# Altium PCB rp2350_led_control_pcb.PcbDoc (part 4 of 4)
Units mm, origin at the board's own origin, x right, y up, seen from the top; angles counter-clockwise.
Board outline 143.9 x 131.3 mm, 4 copper layers (L1(SIG), L2(GND), L3(PWR), L4(SIG)), stack 1.591 mm thick; 168 components, 192 nets, 814 pads, 1003 vias.
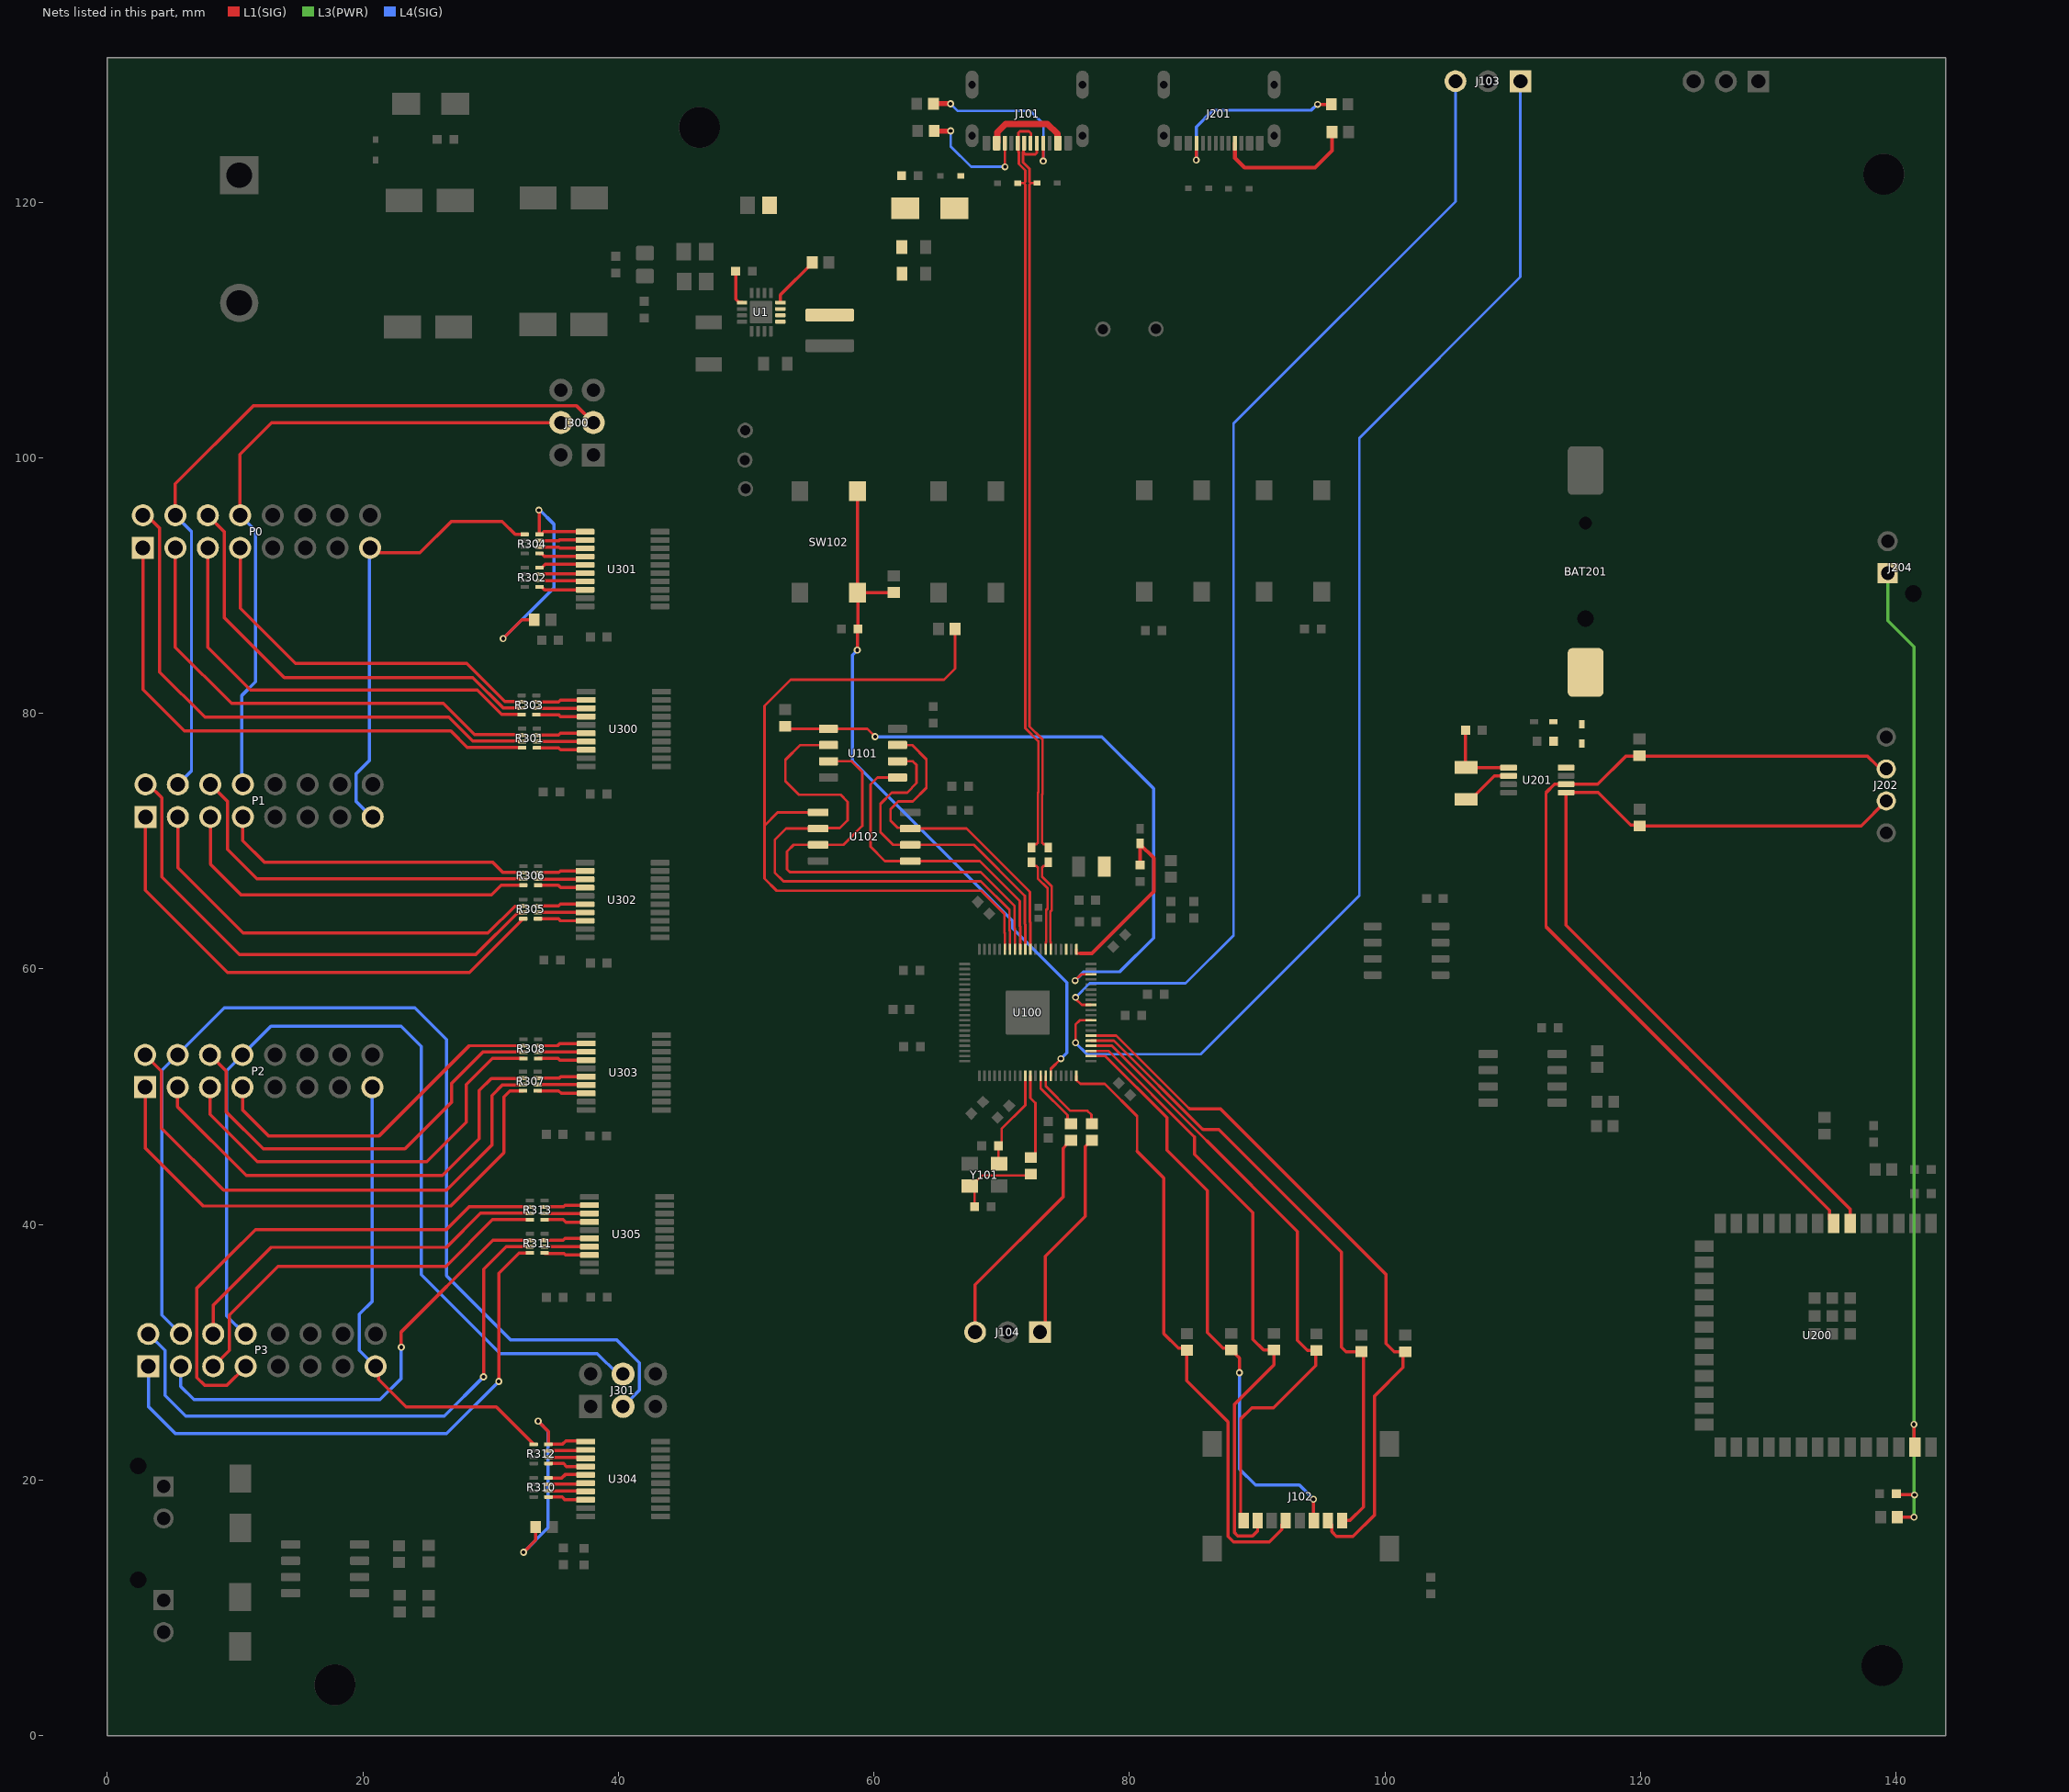
[diagram p5: the nets of this part, all layers, seen from the top]

## Via types
v1: diameter 0.55, hole 0.3, L1(SIG) to L4(SIG), 508 vias
v2: diameter 0.8, hole 0.4, L1(SIG) to L4(SIG), 383 vias
v3: diameter 0.6, hole 0.3, L1(SIG) to L4(SIG), 111 vias
v4: diameter 0.6, hole 0.25, L1(SIG) to L4(SIG), 1 vias

## Nets (pads, with @x,y where several pads share a name; then routed paths per layer and width w, separated by ;. In a path a pad name is that pad's centre, name@x,y a point inside that pad or via, vN(x,y) a via of type N, cw(c..) or ccw(c..) an arc to the next point about the centre after c; other vN are vias at no path point) (continued)
NetJ101_A5: J101.A5 R108.2 | length 13.7
  L1(SIG) w0.2: v1@73.251,123.215 J101.A5@73.251,124.624
  L1(SIG) w0.4: R108.2@64.574,127.703 v1(65.996,127.703)
  L4(SIG) w0.2: v1(65.996,127.703) 66.563,127.137 72.256,127.137 73.258,126.135 73.258,123.222 v1(73.251,123.215)
NetJ101_B5: J101.B5 R107.2 | length 9.3
  L1(SIG) w0.2: J101.B5@70.25,124.625 70.253,124.622 70.253,122.77 v1(70.256,122.767)
  L1(SIG) w0.4: R107.2@64.642,125.575 R107.2@64.717,125.575 v1(66.009,125.575)
  L4(SIG) w0.2: v1(66.009,125.575) 66.009,124.365 67.607,122.767 v1(70.256,122.767)
NetJ201_A5: J201.A5 R202.2 | length 11.1
  L1(SIG) w0.3: J201.A5@88.25,124.625 88.25,123.461 89.003,122.708 94.513,122.708 95.85,124.045 R202.2@95.85,125.495
NetJ201_B5: J201.B5 R201.2 | length 15.3
  L1(SIG) w0.25: v1(85.225,123.299) 85.238,123.311 85.238,124.613 J201.B5@85.25,124.625 ; v1(94.723,127.654) 94.725,127.656 95.871,127.656 R201.2@95.873,127.658
  L4(SIG) w0.25: v1(85.225,123.299) 85.225,125.878 86.542,127.196 94.227,127.196 94.685,127.654 v1(94.723,127.654)
NTC_ADC: C207.2 J204.1 R209.1 U200.39 | length 79.4
  L1(SIG) w0.25: R209.1@140.016,17.169 R209.1@140.089,17.097 v1(141.409,17.097) ; C207.2@140.016,18.931 140.083,18.864 141.407,18.864 v1(141.44,18.831) ; v1(141.394,24.355) 141.394,22.656 U200.39@141.474,22.576
  L3(PWR) w0.25: J204.1@139.343,90.974 139.343,87.257 141.394,85.206 v1(141.394,24.355) 141.401,24.348 141.401,17.104 v1(141.409,17.097)
OE_0: P0.15 P1.15 R304.8 | length 35.8
  L1(SIG) w0.25: P0.15@20.56,92.95 20.959,92.95 21.35,92.559 24.457,92.559 26.922,95.024 30.902,95.024 31.918,94.009 R304.8@32.658,94.009 ; P1.15@20.721,71.89 P1.15@20.76,71.89
  L4(SIG) w0.25: P0.15@20.56,92.95 20.493,92.883 20.493,76.302 19.451,75.259 19.451,73.121 20.682,71.89 P1.15@20.76,71.89
OE_1: P2.15 P3.15 R312.8 | length 38.2
  L1(SIG) w0.25: P2.15@20.734,50.74 P2.15@20.737,50.737 ; P3.15@20.988,28.896 21.229,28.655 21.229,27.887 23.389,25.728 30.442,25.728 R312.8@33.373,22.797
  L4(SIG) w0.25: P2.15@20.734,50.74 20.74,50.734 20.74,33.987 19.726,32.973 19.726,30.158 P3.15@20.988,28.896
OSCI: C203.1 U201.1 Y201.2 | length 6.3
  L1(SIG) w0.25: C203.1@106.308,78.688 106.308,75.794 Y201.2@106.332,75.77 106.353,75.749 U201.1@109.67,75.749
OSCO: U201.2 Y201.1 | length 4.1
  L1(SIG) w0.25: Y201.1@106.332,73.27 106.732,73.27 108.561,75.099 U201.2@109.67,75.099
PG: R2.1 U1.4 | length 4.2
  L1(SIG) w0.25: U1.4@52.675,112.144 52.675,112.748 55.179,115.252 55.179,115.275 R2.1@55.165,115.288
PIN4_E0: J300.3 P0.4 P1.4 | length 60.3
  L1(SIG) w0.25: P0.4@5.32,95.49 5.32,97.959 11.413,104.053 36.733,104.053 J300.3@38.033,102.752
  L4(SIG) w0.25: P0.4@5.32,95.49 6.582,94.228 6.582,75.492 P1.4@5.52,74.43
PIN4_E1: J301.3 P2.4 P3.4 | length 87.1
  L4(SIG) w0.25: P3.4@5.748,31.436 4.274,32.91 4.274,52.06 P2.4@5.494,53.28 9.165,56.951 24.054,56.951 26.534,54.471 26.534,35.986 31.534,30.987 39.835,30.987 41.638,29.184 41.638,27.038 40.625,26.025 40.36,26.025 J301.3@40.36,25.76
PIN8_E0: J300.4 P0.8 P1.8 | length 53
  L1(SIG) w0.25: P0.8@10.4,95.49 10.387,95.503 10.387,97.795 10.373,97.808 10.373,100.264 12.861,102.752 J300.4@35.493,102.752 ; P1.8@10.566,74.464 P1.8@10.6,74.43
  L4(SIG) w0.25: P0.8@10.4,95.49 11.587,94.302 11.587,82.463 10.532,81.408 10.532,74.498 P1.8@10.6,74.43
PIN8_E1: J301.4 P2.8 P3.8 | length 75.5
  L4(SIG) w0.25: P3.8@10.828,31.436 10.75,31.436 9.339,32.847 9.339,52.045 P2.8@10.574,53.28 12.801,55.507 23,55.507 24.573,53.934 24.573,36.089 30.758,29.903 38.338,29.903 39.941,28.3 J301.4@40.36,28.3
QSPI_SCLK: U100.71 U101.6 U102.6 | length 26.3
  L1(SIG) w0.2: U101.6@61.842,76.247 63.053,76.247 63.337,75.963 63.337,74.537 62.6,73.8 61.4,73.8 60.51,72.91 60.51,70.69 61.488,69.712 U102.6@62.842,69.712 67.812,69.712 71.806,65.718 71.806,63.513 71.842,63.476 71.842,62.443 U100.71@71.842,61.532
QSPI_SD0: U100.72 U101.5 U102.5 | length 24.4
  L1(SIG) w0.2: U101.5@61.842,74.977 60.277,74.977 59.735,74.435 59.735,69.565 60.858,68.442 U102.5@62.842,68.442 68.282,68.442 71.406,65.318 71.406,63.347 71.442,63.31 71.442,62.277 U100.72@71.442,61.532
QSPI_SD1: U100.74 U101.2 U102.2 | length 44.1
  L1(SIG) w0.2: U101.2@56.442,77.517 54.224,77.517 53.069,76.362 53.069,74.703 54.14,73.631 57.386,73.631 57.935,73.083 57.935,71.623 57.331,71.02 55.67,71.02 U102.2@55.632,70.982 53.132,70.982 52.237,70.086 52.237,67.545 52.926,66.856 68.368,66.856 70.606,64.618 70.606,63.015 70.642,62.979 U100.74@70.642,61.532
QSPI_SD2: U100.73 U101.3 U102.3 | length 37.7
  L1(SIG) w0.2: U101.3@56.442,76.247 58.272,76.247 59.092,75.427 59.092,71.192 57.612,69.712 U102.3@55.632,69.712 53.712,69.712 53.2,69.2 53.2,67.8 53.429,67.571 68.353,67.571 71.006,64.918 71.006,63.181 71.042,63.145 U100.73@71.042,61.532
QSPI_SD3: U100.70 U101.7 U102.7 | length 27.1
  L1(SIG) w0.2: U101.7@61.842,77.517 62.983,77.517 64.104,76.396 64.104,74.166 63.038,73.1 61.9,73.1 61.3,72.5 61.3,71.6 61.854,71.046 62.778,71.046 U102.7@62.842,70.982 67.242,70.982 72.206,66.018 72.206,63.678 72.242,63.642 72.242,62.608 U100.70@72.242,61.532
QSPI_SS: R101.1 U100.75 U102.1 | length 60.1
  L1(SIG) w0.2: U102.1@55.632,72.252 52.461,72.252 51.424,71.215 ; R101.1@66.35,86.6 66.35,83.501 65.471,82.623 53.478,82.623 51.435,80.58 51.435,75.141 51.424,75.13 51.424,71.215 ; U100.75@70.242,61.532 70.242,62.813 70.206,62.85 70.206,64.318 68.402,66.122 52.385,66.122 51.424,67.083 51.424,71.215
QSPI_SS1: R102.1 U100.58 U101.1 | length 51.5
  L1(SIG) w0.2: R102.1@53.042,78.986 53.241,78.787 59.473,78.787 v1(60.088,78.172) ; v1(75.74,59.082) 75.74,59.092 76.23,59.582 U100.58@76.992,59.582
  L4(SIG) w0.25: v1(60.088,78.172) 77.818,78.172 81.878,74.112 81.878,62.418 79.235,59.775 76.433,59.775 v1(75.74,59.082)
R0_B1: P0.3 R301.7 | length 37.8
  L1(SIG) w0.25: P0.3@5.32,92.95 5.32,85.172 9.724,80.768 26.289,80.768 28.727,78.33 32.446,78.33 R301.7@32.471,78.305
R0_B2: P0.7 R303.7 | length 29.8
  L1(SIG) w0.25: P0.7@10.4,92.95 10.4,88.229 14.718,83.91 28.132,83.91 31.118,80.924 32.409,80.924 R303.7@32.434,80.899
R0_G1: P0.2 R301.6 | length 43.6
  L1(SIG) w0.25: P0.2@2.78,95.49 3.098,95.49 4.092,94.496 4.092,83.229 7.629,79.692 26.728,79.692 28.591,77.83 32.446,77.83 R301.6@32.471,77.805
R0_G2: P0.6 R303.6 | length 34.7
  L1(SIG) w0.25: P0.6@7.86,95.49 9.135,94.215 9.135,87.515 13.844,82.806 28.6,82.806 30.982,80.424 32.409,80.424 R303.6@32.434,80.399
R0_R1: P0.1 R301.5 | length 42.7
  L1(SIG) w0.25: P0.1@2.78,92.95 2.78,81.858 6.021,78.616 26.884,78.616 28.17,77.33 32.17,77.33 32.446,77.33 R301.5@32.471,77.305
R0_R2: P0.5 R303.5 | length 34.5
  L1(SIG) w0.25: P0.5@7.86,92.95 7.86,85.167 11.205,81.823 28.946,81.823 30.845,79.924 32.133,79.924 32.409,79.924 R303.5@32.434,79.899
R1_B1: P1.3 R305.7 | length 34
  L1(SIG) w0.25: P1.3@5.52,71.89 5.52,67.921 10.631,62.81 29.794,62.81 31.888,64.905 32.521,64.905 R305.7@32.546,64.93
R1_B2: P1.7 R306.7 | length 24.8
  L1(SIG) w0.25: P1.7@10.6,71.89 10.6,70.041 12.308,68.333 30.173,68.333 30.933,67.573 32.531,67.573 R306.7@32.556,67.548
R1_G1: P1.2 R305.6 | length 40.1
  L1(SIG) w0.25: P1.2@2.98,74.43 3.214,74.43 4.251,73.393 4.251,67.205 10.331,61.124 28.829,61.124 32.109,64.405 32.245,64.405 32.521,64.405 R305.6@32.546,64.43
R1_G2: P1.6 R306.6 | length 29.8
  L1(SIG) w0.25: P1.6@8.06,74.43 8.092,74.43 9.412,73.11 9.412,69.34 11.705,67.048 R306.6@32.556,67.048
R1_R1: P1.1 R305.5 | length 39.7
  L1(SIG) w0.25: P1.1@2.98,71.89 2.98,66.156 9.417,59.719 28.336,59.719 R305.5@32.546,63.93
R1_R2: P1.5 R306.5 | length 29.5
  L1(SIG) w0.25: P1.5@8.06,71.89 8.06,68.185 10.46,65.785 30.073,65.785 30.835,66.548 R306.5@32.556,66.548
R2_B1: P2.3 R307.7 | length 36.2
  L1(SIG) w0.25: P2.3@5.494,50.74 5.494,49.211 10.881,43.823 26.231,43.823 29.109,46.701 29.109,50.49 30.053,51.434 32.505,51.434 R307.7@32.53,51.459
R2_B2: P2.7 R308.7 | length 27.5
  L1(SIG) w0.25: P2.7@10.574,50.74 10.574,48.985 12.648,46.911 21.243,46.911 28.321,53.99 R308.7@32.57,53.99
R2_G1: P2.2 R307.6 | length 42.3
  L1(SIG) w0.25: P2.2@2.954,53.28 4.236,51.998 4.236,47.538 9.098,42.676 26.548,42.676 30.096,46.224 30.096,50.099 30.931,50.934 32.505,50.934 R307.6@32.53,50.959
R2_G2: P2.6 R308.6 | length 33.5
  L1(SIG) w0.25: P2.6@8.034,53.28 9.311,52.003 9.311,48.804 12.205,45.91 23.292,45.91 26.957,49.574 26.957,51.067 29.38,53.49 R308.6@32.57,53.49
R2_R1: P2.1 R307.5 | length 42.5
  L1(SIG) w0.25: P2.1@2.954,50.74 2.954,45.999 7.506,41.447 26.869,41.447 31.038,45.616 31.038,49.985 31.512,50.459 R307.5@32.53,50.459
R2_R2: P2.5 R308.5 | length 33.3
  L1(SIG) w0.25: P2.5@8.034,50.74 8.034,48.62 11.736,44.919 25.007,44.919 28.099,48.011 28.099,50.944 30.145,52.99 R308.5@32.57,52.99
R3_B1: P3.3 R311.7 | length 36.6
  L1(SIG) w0.25: v1(23.004,30.395) 23.004,31.601 30.176,38.773 R311.7@33.078,38.773
  L4(SIG) w0.254: P3.3@5.748,28.896 5.748,27.328 6.785,26.292 21.331,26.292 23.004,27.964 v1(23.004,30.395)
R3_B2: P3.7 R313.7 | length 40.4
  L1(SIG) w0.25: P3.7@10.828,28.896 9.36,27.428 7.598,27.428 7.007,28.019 7.007,35.017 9.532,37.542 11.597,39.607 26.53,39.607 28.302,41.378 R313.7@33.078,41.378
R3_G1: P3.2 R311.6 | length 45
  L1(SIG) w0.25: v1(29.438,28.079) 29.455,28.096 29.455,36.497 31.231,38.273 R311.6@33.078,38.273
  L4(SIG) w0.25: P3.2@3.208,31.436 3.278,31.436 3.278,31.366 4.505,30.139 4.505,26.634 6.134,25.005 10.587,25.005
  L4(SIG) w0.254: 10.587,25.005 26.364,25.005 v1(29.438,28.079)
R3_G2: P3.6 R313.6 | length 30
  L1(SIG) w0.25: P3.6@8.288,31.436 8.288,33.688 12.813,38.213 26.543,38.213 29.208,40.878 R313.6@33.078,40.878
R3_R1: P3.1 R311.5 | length 44.7
  L1(SIG) w0.25: v1(30.634,27.723) 30.634,36.195 32.212,37.773 R311.5@33.078,37.773
  L4(SIG) w0.254: P3.1@3.208,28.896 3.208,25.755 5.322,23.64 26.551,23.64 v1(30.634,27.723)
R3_R2: P3.5 R313.5 | length 31.2
  L1(SIG) w0.25: P3.5@8.288,28.896 9.544,30.152 9.544,32.917 13.36,36.732 26.506,36.732 30.152,40.378 R313.5@33.078,40.378
R_XOUT: C126.2 R112.2 Y101.3 | length 6.9
  L1(SIG) w0.2: C126.2@67.869,41.392 67.869,42.632 Y101.3@67.494,43.007 67.619,43.007 68.444,43.832 72.178,43.832 R112.2@72.286,43.939
RASP_UART_RX: J103.3 U100.52 | length 89.9
  L1(SIG) w0.2: v1(75.779,57.775) 75.779,57.666 76.263,57.182 U100.52@76.992,57.182
  L4(SIG) w0.2: v1(75.779,57.775) 76.873,58.869 84.396,58.869 88.142,62.615 88.142,102.68 105.516,120.055 J103.3@105.516,129.463
RASP_UART_TX: J103.1 U100.49 | length 99.5
  L1(SIG) w0.2: v1(75.775,54.225) 75.775,55.648 76.109,55.982 U100.49@76.992,55.982
  L4(SIG) w0.2: v1(75.775,54.225) 76.678,53.322 85.575,53.322 97.99,65.737 97.99,101.536 110.596,114.142 J103.1@110.596,129.463
RUN: C105.2 R104.2 SW102.3 SW102.4 U100.35 | length 56.3
  L1(SIG) w0.2: U100.35@73.842,51.632 73.842,52.179 v1(74.635,52.973)
  L1(SIG) w0.25: v1(58.691,84.95) 58.721,84.98 58.721,86.571 C105.2@58.75,86.6 58.75,89.399 SW102.3@58.712,89.437 ; SW102.4@58.712,97.387 SW102.3@58.712,89.437 ; R104.2@61.542,89.46 58.735,89.46 SW102.3@58.712,89.437
  L4(SIG) w0.25: v1(58.691,84.95) 58.301,84.56 58.301,76.286 70.849,63.738 70.849,63.181 75.097,58.933 75.097,53.434 v1(74.635,52.973)
SC: R113.1 U100.33 | length 4.6
  L1(SIG) w0.2: U100.33@73.042,51.632 73.042,50.669 75.142,48.569 R113.1@75.142,47.882
SD: R111.1 U100.34 | length 6.1
  L1(SIG) w0.2: U100.34@73.442,51.632 73.442,50.835 75.377,48.9 76.702,48.9 77.014,48.588 77.014,47.877 R111.1@77.064,47.877
SD_CMD: J102.3 R118.2 U100.42 | length 46.6
  L1(SIG) w0.2: U100.42@76.992,53.182 78.112,53.182 82.933,48.362 ; J102.3@94.4,16.861 J102.3@94.43,16.831
  L1(SIG) w0.25: 82.933,48.362 82.933,45.814 86.103,42.644 86.103,31.548 87.313,30.339 87.813,30.339 R118.2@87.97,30.181 88.02,30.181 88.32,29.881 88.32,29.831 88.6,29.551 v1(88.6,28.4) ; J102.3@94.4,16.861 v1(94.4,18.5)
  L4(SIG) w0.25: v1(88.6,28.4) 88.6,20.858 89.857,19.601 93.299,19.601 v1(94.4,18.5)
SD_DAT0: J102.7 R117.2 U100.43 | length 49.1
  L1(SIG) w0.2: U100.43@76.992,53.582 78.347,53.582 85.088,46.842
  L1(SIG) w0.25: 85.088,46.842 85.088,45.5 89.658,40.929 89.658,31.021 90.499,30.181 R117.2@91.299,30.181 91.299,29.015 88.2,25.916 88.2,15.9 88.467,15.633 89.633,15.633 90.03,16.03 J102.7@90.03,16.831
SD_DAT1: J102.8 R116.2 U100.44 | length 49.4
  L1(SIG) w0.2: U100.44@76.992,53.982 78.62,53.982 86.054,46.548
  L1(SIG) w0.25: 86.054,46.548 93.136,39.466 93.136,30.942 93.936,30.142 R116.2@94.636,30.142 ; J102.8@88.93,16.831 88.7,17.061 88.7,24.779 89.569,25.648 91.278,25.648 94.586,28.956 R116.2@94.586,30.142
SD_DAT2: J102.1 R115.2 U100.45 | length 49.9
  L1(SIG) w0.2: U100.45@76.992,54.382 78.786,54.382 85.733,47.435
  L1(SIG) w0.25: 85.751,47.452 85.768,47.435 86.989,47.435 96.593,37.83 96.593,30.407 96.952,30.048 R115.2@98.146,30.048 98.301,29.894 98.301,17.901 97.231,16.831 J102.1@96.63,16.831
SD_DAT3: J102.2 R114.2 U100.46 | length 56.9
  L1(SIG) w0.2: U100.46@76.992,54.782 78.951,54.782 84.678,49.056
  L1(SIG) w0.25: 84.695,49.073 84.713,49.056 87.121,49.056 100.082,36.096 100.082,30.677 100.72,30.038 R114.2@101.583,30.038 101.416,29.871 101.416,28.815 99.192,26.591 99.192,17.292 97.5,15.6 96.2,15.6 95.83,15.97 95.83,16.531 J102.2@95.53,16.831
SD_SCK: J102.5 R119.2 U100.40 | length 48
  L1(SIG) w0.2: U100.40@75.842,51.632 75.842,51.307 76.149,51 78.065,51 80.594,48.472 80.594,45.725
  L1(SIG) w0.25: 80.594,45.725 82.683,43.636 82.683,31.458 83.828,30.313 84.328,30.313 R119.2@84.486,30.155 84.486,27.768 87.7,24.554 87.7,15.6 88.15,15.15 90.95,15.15 91.93,16.13 91.93,16.531 J102.5@92.23,16.831
SENSOR_SCL: J202.2 R206.2 U200.7 U201.6 | length 71.3
  L1(SIG) w0.25: U201.6@114.17,74.449 113.26,74.449 112.6,73.789 112.6,63.3 134.799,41.101 134.799,40.401 U200.7@135.124,40.076 ; U201.6@114.172,74.447 116.651,74.447 118.871,76.666 137.745,76.666 138.525,75.886 138.986,75.886 J202.2@139.225,75.647
SENSOR_SDA: J202.3 R207.2 U200.6 U201.5 | length 69.9
  L1(SIG) w0.25: U200.6@136.394,40.076 136.394,41.206 114.17,63.43 U201.5@114.17,73.799 116.691,73.799 119.233,71.257 119.87,71.257 R207.2@119.936,71.191 137.269,71.191 J202.3@139.225,73.147
SS_TR: C10.2 U1.9 | length 2.8
  L1(SIG) w0.25: C10.2@49.175,114.594 49.175,112.394 49.425,112.144 U1.9@49.675,112.144
SW: L1.1 U1.1 U1.2 U1.3
SWCLK: J104.3 R113.2 | length 18.1
  L1(SIG) w0.25: J104.3@67.921,31.584 67.921,35.281 74.804,42.164 74.804,45.969 75.072,46.238 75.072,46.288 75.372,46.588 R113.2@75.422,46.588
SWDIO: J104.1 R111.2 | length 16.7
  L1(SIG) w0.25: J104.1@73.001,31.584 73.412,31.995 73.412,37.52 76.536,40.645 76.536,46.099 77.014,46.577 R111.2@77.064,46.577
USB-C_N: D104.2 J101.A7 J101.B7 R106.1 | length 58.5
  L1(SIG) w0.2: 71.75,123.863 71.867,123.746 72.633,123.746 72.75,123.863 J101.B7@72.75,124.625 ; J101.A7@71.75,124.625 71.7,124.575 71.7,123.948 71.664,123.911 71.664,123.119 72.17,122.613 72.17,121.61 72.287,121.493 ; D104.2@72.752,121.5 72.744,121.493 72.287,121.493 ; R106.1@73.642,69.482 73.642,69.553 73.442,69.753 73.273,69.753 73.156,69.871 73.156,73.651 73.19,73.685 73.19,77.954 73.094,78.05 72.17,78.974 72.17,121.376 72.287,121.493
USB-C_P: D103.2 J101.A6 J101.B6 R105.1 | length 59.6
  L1(SIG) w0.2: D103.2@71.26,121.486 71.268,121.493 71.725,121.493 ; J101.B6@71.3,124.575 71.3,123.948 71.337,123.911 71.337,122.983 71.843,122.477 71.843,121.61 71.725,121.493 ; J101.B6@71.302,124.625 71.302,125.433 71.419,125.55 72.127,125.55 72.302,125.376 J101.A6@72.302,124.317 ; R105.1@72.342,69.482 72.342,69.553 72.542,69.753 72.711,69.753 72.829,69.87 72.829,73.786 72.863,73.82 72.863,77.819 71.843,78.839 71.843,121.376 71.725,121.493
USB_N: R106.2 U100.66 | length 7.5
  L1(SIG) w0.2: R106.2@73.642,68.332 73.642,68.261 73.442,68.061 73.273,68.061 73.156,67.943 73.156,67.216 73.915,66.457 73.915,64.583 73.805,64.474 73.805,62.103 73.842,62.067 U100.66@73.842,61.532
USB_P: R105.2 U100.67 | length 7.5
  L1(SIG) w0.2: R105.2@72.342,68.332 72.342,68.261 72.542,68.061 72.711,68.061 72.829,67.944 72.829,67.081 73.588,66.321 73.588,64.719 73.478,64.609 73.478,62.103 73.442,62.067 U100.67@73.442,61.532
VBAT: BAT201.P D202.2 | length 0.4
  L1(SIG) w0.3: BAT201.P@115.408,82.908 BAT201.P@115.7,83.2
VBUS: D101.2 D102.2 J101.A4_B9 J101.B4_A9 | length 6.9
  L1(SIG) w0.5: J101.B4_A9@69.6,124.625 69.65,124.675 69.65,125.153 69.65,125.47 70.308,126.129 73.586,126.129 74.35,125.364 74.35,124.675 J101.A4_B9@74.4,124.625 J101.A4_B9@74.417,124.642
VBUS_IN: C101.2 C102.2 C103.2 D101.1 R103.1
VDDRTC: C202.2 D201.1 D202.1 U201.8
VREG_AVDD: C110.2 R109.1 U100.61 | length 14.2
  L1(SIG) w0.2: U100.61@75.842,61.532 75.842,61.207 76.166,61.207
  L1(SIG) w0.3: 76.166,61.207 77.053,61.207 81.899,66.052 81.899,68.676 R109.1@80.835,69.74 ; C110.2@80.835,68.14 R109.1@80.835,69.74 ; R109.1@80.835,69.815 R109.1@80.835,69.74
VREG_LX: L101.2 U100.63
XIN: C127.2 U100.30 Y101.1 | length 7.8
  L1(SIG) w0.2: Y101.1@69.794,44.757 69.739,44.812 C127.2@69.739,46.158 69.989,46.408 69.989,47.486 71.842,49.339 U100.30@71.842,51.632
XOUT: R112.1 U100.31 | length 6.7
  L1(SIG) w0.2: U100.31@72.242,51.632 72.242,49.907 72.639,49.509 72.639,45.564 72.314,45.239 R112.1@72.286,45.239
Y0_A: R302.1 U301.18 | length 3.7
  L1(SIG) w0.25: R302.1@33.82,89.89 33.995,89.89 34.22,89.665 U301.18@37.382,89.665
Y0_B: R302.2 U301.17 | length 3.6
  L1(SIG) w0.25: R302.2@33.82,90.39 33.845,90.365 37.332,90.365 U301.17@37.382,90.315
Y0_B1: R301.3 U300.16 | length 3.9
  L1(SIG) w0.25: R301.3@33.621,78.305 35.326,78.305 35.464,78.443 U300.16@37.482,78.443
Y0_B2: R303.3 U300.12 | length 4
  L1(SIG) w0.25: R303.3@33.584,80.899 35.305,80.899 35.449,81.043 U300.12@37.482,81.043
Y0_C: R302.3 U301.16 | length 3.6
  L1(SIG) w0.25: R302.3@33.82,90.89 33.845,90.915 37.332,90.915 U301.16@37.382,90.965
Y0_CLK: R304.2 U301.13 | length 3.6
  L1(SIG) w0.25: R304.2@33.808,93.009 35.329,93.009 35.423,92.915 U301.13@37.382,92.915
Y0_D: R302.4 U301.15 | length 3.7
  L1(SIG) w0.25: R302.4@33.82,91.39 33.995,91.39 34.267,91.662 37.335,91.662 U301.15@37.382,91.615
Y0_E: R304.1 U301.14 | length 3.7
  L1(SIG) w0.25: R304.1@33.808,92.509 33.983,92.509 34.227,92.265 U301.14@37.382,92.265
Y0_G1: R301.2 U300.17 | length 3.9
  L1(SIG) w0.25: R301.2@33.621,77.805 33.627,77.799 37.476,77.799 U300.17@37.482,77.793
Y0_G2: R303.2 U300.13 | length 3.9
  L1(SIG) w0.25: R303.2@33.584,80.399 33.587,80.396 37.479,80.396 U300.13@37.482,80.393
Y0_LAT: R304.3 U301.12 | length 3.6
  L1(SIG) w0.25: R304.3@33.808,93.509 35.336,93.509 35.392,93.565 U301.12@37.382,93.565
Y0_OE: R300.1 R304.4 U301.11 | length 20.9
  L1(SIG) w0.25: v1(30.974,85.849) 32.449,87.323 R300.1@33.415,87.323 ; v1(33.773,95.901) 33.791,95.884 33.791,94.026 R304.4@33.808,94.009 33.983,94.009 34.008,94.034 34.008,94.069 34.154,94.215 U301.11@37.382,94.215
  L4(SIG) w0.25: v1(30.974,85.849) 34.94,89.814 34.94,94.816 33.854,95.901 v1(33.773,95.901)
Y0_R1: R301.1 U300.18 | length 3.9
  L1(SIG) w0.25: R301.1@33.621,77.305 35.314,77.305 35.476,77.143 U300.18@37.482,77.143
Y0_R2: R303.1 U300.14 | length 4
  L1(SIG) w0.25: R303.1@33.584,79.899 35.299,79.899 35.455,79.743 U300.14@37.482,79.743
Y1_A: R310.1 U304.18 | length 3
  L1(SIG) w0.25: R310.1@34.523,18.668 35.604,18.668 35.791,18.482 37.403,18.482 U304.18@37.428,18.457
Y1_B: R310.2 U304.17 | length 2.9
  L1(SIG) w0.25: R310.2@34.523,19.168 34.548,19.143 37.392,19.143 U304.17@37.428,19.107
Y1_B1: R305.3 U302.16 | length 3.7
  L1(SIG) w0.25: R305.3@33.696,64.93 35.315,64.93 35.451,65.065 U302.16@37.382,65.065
Y1_B2: R306.3 U302.12 | length 3.7
  L1(SIG) w0.25: R306.3@33.706,67.548 35.329,67.548 35.446,67.665 U302.12@37.382,67.665
Y1_C: R310.3 U304.16 | length 2.9
  L1(SIG) w0.25: R310.3@34.523,19.668 34.548,19.693 37.364,19.693 U304.16@37.428,19.757
Y1_CLK: R312.2 U304.13 | length 2.9
  L1(SIG) w0.25: R312.2@34.523,21.797 34.548,21.772 37.363,21.772 U304.13@37.428,21.707
Y1_D: R310.4 U304.15 | length 3
  L1(SIG) w0.25: R310.4@34.523,20.168 35.576,20.168 35.833,20.425 37.41,20.425 U304.15@37.428,20.407
Y1_E: R312.1 U304.14 | length 3
  L1(SIG) w0.25: R312.1@34.523,21.297 35.697,21.297 35.936,21.058 U304.14@37.428,21.057 U304.14@37.428,21.057
Y1_G1: R305.2 U302.17 | length 3.7
  L1(SIG) w0.25: R305.2@33.696,64.43 33.704,64.422 37.375,64.422 U302.17@37.382,64.415
Y1_G2: R306.2 U302.13 | length 3.7
  L1(SIG) w0.25: R306.2@33.706,67.048 33.722,67.031 37.366,67.031 U302.13@37.382,67.015
Y1_LAT: R312.3 U304.12 | length 2.9
  L1(SIG) w0.25: R312.3@34.523,22.297 34.548,22.322 37.393,22.322 U304.12@37.428,22.357
Y1_OE: R309.1 R312.4 U304.11 | length 19
  L1(SIG) w0.25: v1(32.571,14.351) 33.519,15.299 R309.1@33.519,16.325 ; v1(33.712,24.61) 34.523,23.8 34.523,22.822 34.498,22.797 34.479,22.797 35.612,22.797 35.877,23.062 37.373,23.062 U304.11@37.428,23.007
  L4(SIG) w0.25: v1(32.571,14.351) 34.497,16.277 34.497,23.826 v1(33.712,24.61)
Y1_R1: R305.1 U302.18 | length 3.8
  L1(SIG) w0.25: R305.1@33.696,63.93 35.301,63.93 35.465,63.765 U302.18@37.382,63.765
Y1_R2: R306.1 U302.14 | length 3.8
  L1(SIG) w0.25: R306.1@33.706,66.548 35.296,66.548 35.479,66.365 U302.14@37.382,66.365
Y2_B1: R307.3 U303.16 | length 3.8
  L1(SIG) w0.25: R307.3@33.68,51.459 35.371,51.459 35.478,51.565 U303.16@37.482,51.565
Y2_B2: R308.3 U303.12 | length 3.8
  L1(SIG) w0.25: R308.3@33.72,53.99 35.226,53.99 35.401,54.165 U303.12@37.482,54.165
Y2_G1: R307.2 U303.17 | length 3.8
  L1(SIG) w0.25: R307.2@33.68,50.959 33.701,50.937 37.46,50.937 U303.17@37.482,50.915
Y2_G2: R308.2 U303.13 | length 3.8
  L1(SIG) w0.25: R308.2@33.72,53.49 33.733,53.502 37.47,53.502 U303.13@37.482,53.515
Y2_R1: R307.1 U303.18 | length 3.9
  L1(SIG) w0.25: R307.1@33.68,50.459 35.328,50.459 35.521,50.265 U303.18@37.482,50.265
Y2_R2: R308.1 U303.14 | length 3.8
  L1(SIG) w0.25: R308.1@33.72,52.99 35.279,52.99 35.404,52.865 U303.14@37.482,52.865
Y3_B1: R311.3 U305.16 | length 3.6
  L1(SIG) w0.25: R311.3@34.228,38.773 35.667,38.773 35.805,38.911 U305.16@37.736,38.911
Y3_B2: R313.3 U305.12 | length 3.6
  L1(SIG) w0.25: R313.3@34.228,41.378 35.687,41.378 35.82,41.511 U305.12@37.736,41.511
Y3_G1: R311.2 U305.17 | length 3.5
  L1(SIG) w0.25: R311.2@34.228,38.273 34.234,38.267 37.73,38.267 U305.17@37.736,38.261
Y3_G2: R313.2 U305.13 | length 3.5
  L1(SIG) w0.25: R313.2@34.228,40.878 34.237,40.87 37.727,40.87 U305.13@37.736,40.861
Y3_R1: R311.1 U305.18 | length 3.5
  L1(SIG) w0.25: R311.1@34.241,37.734 35.732,37.734 35.855,37.611 U305.18@37.736,37.611
Y3_R2: R313.1 U305.14 | length 3.6
  L1(SIG) w0.25: R313.1@34.228,40.378 35.678,40.378 35.882,40.173 37.698,40.173 U305.14@37.736,40.211
pads on no net: BAT201.1 BAT201.2 J101.A8 J101.B8 J201.A4_B9 J201.A8 J201.B4_A9 J201.B8 J204.MH1 J205.MH1 J206.MH1 U200.11 U200.15 U200.16 U200.22 U200.23 U200.24 U200.25 U200.26 U200.28 U200.29 U200.30 U200.31 U200.32 U200.33 U200.34 U200.35 U201.3 U201.7 U202.1 U202.2 U202.3 U202.7 U300.11 U300.15 U302.11 U302.15 U303.11 U303.15 U305.11 U305.15

## Polygon pours and split planes (outlines as drawn)
VBUS_IN on L1(SIG) "VBUS_IN_L01_P006" (solid, remove dead copper, pour order 6): 60.664,120.36 51.341,120.36 51.341,119.069 60.664,119.069 60.664,113.289 62.772,113.289 62.772,122.971 60.664,122.971
VBUS_IN on L1(SIG) "VBUS_IN_PWR" (solid, pour order 7): 51.449,120.464 51.444,120.459 51.444,119.095 61.571,119.095 61.64,119.027 61.64,118.775 63.391,118.775 63.395,118.77 63.4,118.775 63.4,120.244
+5V on L1(SIG) "+5V_PWR_L1" (solid, remove dead copper, pour order 8): 49.088,110.451 50.031,110.451 50.031,111.274 49.984,111.321 48.786,111.321 47.591,112.515 45.686,112.515 45.686,114.818 45.529,114.976 41.247,114.976 41.247,111.85 41.276,111.821 43.746,111.821 45.531,110.036 48.207,110.036 48.207,110.35 48.335,110.478
+5V_PWR on L1(SIG) "+5V_PWR_L01_P012" (solid, pour order 12): 6.031,117.428 6.031,130.137 14.786,130.137 14.786,117.428
+5V_PWR on L1(SIG) "+5V_PWR_L01_P014" (solid, pour order 14): 14.13,130.137 25.151,130.137 25.156,130.132 25.156,126.27 22.359,126.27 22.358,126.271 22.358,124.209 14.787,124.209 14.128,124.867
+5V_IN on L1(SIG) "+5V_IN_L01_P017" (solid, pour order 17): 26.405,107.562 26.405,121.619 34.501,121.619 34.501,107.562
+5V_IN on L1(SIG) "+5V_IN_L01_P018" (solid, pour order 18): 26.669,116.582 26.669,129.965 34.182,129.965 34.182,116.582
SW on L1(SIG) "SW_L01_P019" (solid, pour order 19): 52.288,111.791 53.882,111.791 54.791,112.699 59.407,112.699 59.407,109.88 59.41,109.877 54.537,109.877 53.91,110.504 52.284,110.504
GND on L1(SIG) "GND_L01_P026" (solid, pour order 26): 5.262,107.538 5.262,115.561 24.93,115.561 24.93,107.538
GND on L1(SIG) "GND_L01_P027" (solid, pour order 27): 19.708,113.047 19.708,123.781 24.953,123.781 24.953,113.047
GND on L1(SIG) "GND_L01_P029" (solid, pour order 29): 23.099,123.394 23.099,125.742 26.459,125.742 26.459,123.394
+5V_IN on L1(SIG) "+5V_IN_L01_P031" (solid, pour order 31): 43.346,115.536 43.343,115.539 43.124,115.539 40.584,115.539 40.584,115.247 34.984,115.247 34.984,114.475 34.944,114.435 26.676,114.435 26.676,115.193 26.623,115.247 26.623,117.007 43.346,117.007 43.346,115.767
+3V3 on L1(SIG) "+3V3_L01_P036" (solid, pour order 36): 54.508,109.404 53.385,108.281 53.385,108.144 52.445,108.144 52.308,108.006 52.308,104.836 59.444,104.836 59.429,104.851 59.429,109.471
+5V_IN on L1(SIG) "+5V_IN_L01_P040" (solid, pour order 40): 42.633,119.078 42.633,120.474 50.619,120.474 50.619,119.078
+5V_IN on L1(SIG) "+5V_IN_L01_P045" (solid, pour order 45): 43.798,119.317 43.752,119.317 41.193,116.758 41.453,116.498 41.456,116.495 40.261,115.293 39.068,116.987 42.633,120.474
VBUS on L1(SIG) "VBUS_L01_P047" (solid, pour order 47): 69.284,125.186 69.291,125.179 69.93,125.179 69.93,123.503 67.797,121.37 66.113,121.37 66.113,122.731 66.155,122.773 68.246,122.773 68.246,122.815 69.277,123.846
VBUS on L1(SIG) "VBUS_L01_P048" (solid, pour order 48): 65.263,118.299 65.263,121.307 67.863,121.538 67.863,118.299
FAN2_OUT on L1(SIG) "FAN2_OUT_L01_P069" (solid, pour order 69): 3.499,17.796 3.588,17.885 6.205,17.885 7.068,17.022 11.706,17.022 13.326,15.403 15.214,15.403 15.214,13.247 15.14,13.172 13.237,13.172 11.007,15.403 6.859,15.403 6.353,15.908 3.499,15.908
FAN1_OUT on L1(SIG) "FAN1_OUT_L01_P070" (solid, pour order 70): 3.362,9.01 5.699,9.01 6.829,7.88 11.555,7.88 13.326,9.651 13.326,12.86 15.199,12.86 15.244,12.816 15.244,8.697 12.523,5.977 3.362,5.977
+5V on L1(SIG) "+5V_L01_P071" (solid, pour order 71): 34.116,85.362 34.116,88.546 38.43,88.546 38.43,85.362
+5V on L1(SIG) "+5V_L01_P072" (solid, pour order 72): 34.233,14.138 34.233,17.321 38.547,17.321 38.54,15.724 38.547,14.138
+5V on L1(SIG) "+5V_L01_P073" (solid, pour order 73): 34.972,59.589 34.972,62.669 38.413,62.669 38.413,59.589
+5V on L1(SIG) "+5V_L01_P074" (solid, pour order 74): 34.897,73.223 34.897,76.038 38.338,76.038 38.338,73.223
+5V on L1(SIG) "+5V_L01_P084" (solid, pour order 84): 34.939,46.093 34.939,49.173 38.38,49.173 38.38,46.093
+5V on L1(SIG) "+5V_L01_P090" (solid, pour order 90): 35.093,33.462 35.093,36.542 38.534,36.542 38.534,33.462
GND on L1(SIG) "GND_L01_P091" (solid, pour order 91): 49.823,116.065 52.365,116.065 52.525,115.905 52.525,113.492 52.024,112.991 52.024,110.199 53.116,110.199 53.548,109.767 53.548,108.952 53.18,108.585 52.125,108.585 52.125,105.308 51.534,104.717 44.427,104.717 44.427,109.79 47.627,109.79 49.007,108.41 51.254,108.41 51.254,110.361 51.112,110.503 50.345,110.503 50.345,110.525 50.267,110.603 50.267,113.77 49.808,114.23 49.808,115.655
+3V3 on L1(SIG) "+3V3_L01_P092" (solid, pour order 92): 139.334,43.831 139.567,43.598 140.762,43.598 140.762,41.357 141.076,41.042 141.076,39.284 141.816,39.284 141.816,56.39 140.762,57.444 129.869,57.444 129.512,57.087 129.512,54.019 137.71,54.019 139.334,52.395
+3V3 on L1(SIG) "+3V3_L01_P093" (solid, pour order 93): 113.41,56.291 113.225,56.106 113.225,54.447 112.713,53.935 112.713,52.956 117.559,52.956 117.559,56.291
VDDRTC on L1(SIG) "VDDRTC_L01_P094" (solid, pour order 94): 112.841,79.914 113.525,79.914 113.525,77.987 115.564,77.987 116.027,77.525 116.027,76.182 115.381,75.536 113.493,75.536 112.841,76.188
VBAT on L1(SIG) "VBAT_L01_P095" (solid, pour order 95): 114.955,79.185 115.206,78.934 115.206,78.767 115.694,78.767 115.942,79.015 115.942,80.88 116.845,81.783 116.845,84.788 114.774,84.788 114.774,81.609
+3V3 on L1(SIG) "+3V3_L01_P097" (solid, pour order 97): 64.873,74.895 65.019,75.041 66.597,75.041 66.597,71.647 66.517,71.568 66.504,71.581 62.407,71.581 61.983,72.005 62.049,72.071 62.049,72.615 63.59,72.615 63.691,72.716
VREG_LX on L1(SIG) "VREG_LX_L01_P107" (solid, pour order 107): 74.966,62.365 74.966,61.066 75.119,61.066 75.119,62.201 75.535,62.617 76.801,62.853 76.801,65.965 77.648,66.813 78.537,66.813 78.78,67.055 78.78,68.867 78.545,69.101 78.538,69.094 77.371,69.094 77.371,67.165 76.632,66.426 76.632,63.077 75.491,62.89
+1V1 on L1(SIG) "+1V1_L01_P109" (solid, pour order 109): 74.303,64.809 74.88,64.713 75.192,64.751 76.384,64.751 76.384,68.664 75.879,69.169 74.634,69.169 74.303,68.838
GND on L1(SIG) "GND_L01_P110" (solid, pour order 110): 105.913,48.913 105.937,48.889 108.025,48.889 108.025,54.211 107.848,54.388 105.878,54.388
GND on L1(SIG) "GND_L01_P111" (solid, pour order 111): 101.08,66.727 103.293,66.727 103.293,64.309 101.135,64.309 101.098,64.346
GND on L1(SIG) "GND_L01_P113" (solid, pour order 113): 110.997,57.333 111.006,57.343 113.186,57.343 113.186,56.623 112.758,56.195 112.758,54.638 111.658,54.638 111.649,54.629 110.997,55.281 110.997,56.273
GND on L1(SIG) "GND_L01_P115" (solid, pour order 115): 108.38,79.5 108.949,78.931 109.408,78.931 110.013,78.327 112.395,78.327 112.395,77.057 112.045,76.706 107.062,76.706 107.062,79.488 107.074,79.5
GND on L1(SIG) "GND_L01_P116" (solid, pour order 116): 90.796,17.533 90.796,16.331 91.391,16.331 91.391,17.693 91.605,17.907 92.12,17.907 92.12,17.936 92.393,18.208 92.393,18.947 89.903,18.947 89.874,18.976 89.874,18.387
GND on L1(SIG) "GND_L01_P117" (solid, pour order 117): 66.807,82.042 66.807,79.634 65.811,79.634 65.426,80.019 64.174,80.019 64.174,81.014 64.196,80.993 65.415,80.993 65.415,81.41 66.025,82.02
GND on L1(SIG) "GND_L01_P118" (solid, pour order 118): 67.306,75.292 67.353,75.339 69.831,75.339 69.831,71.332 69.815,71.347 67.227,71.347
GND on L1(SIG) "GND_L01_P123" (solid, pour order 123): 63.548,117.324 63.499,117.275 63.499,113.703 64.384,113.703 65.269,112.818 66.236,112.818 66.236,117.226 65.826,117.636 64.319,117.636
GND on L1(SIG) "GND_L01_P127" (solid, pour order 127): 63.109,122.954 63.109,121.844 63.148,121.805 64.797,121.805 65.461,121.805 65.461,122.963 65.989,122.963 66.13,123.104 66.13,124.179 62.592,124.179 62.592,123.319
VBUS_IN on L1(SIG) "VBUS_IN_PWR" (solid, remove dead copper, pour order 130): 51.341,119.069 61.122,119.069 61.122,118.704 61.136,118.678 63.582,118.678 63.582,120.36 51.341,120.36
GND on L1(SIG) "GND_PWR_L1" (solid, remove dead copper, shelved, pour order 129): 0,131.3 0.001,131.299 0.001,0.003 0.003,0.001 143.898,0.001 143.899,0.002 143.899,131.297 143.895,131.301
+5V_IN on L3(PWR) "+5V_IN_PWR_L3" (solid, remove dead copper, pour order 59): 27.043,108.114 27.043,123.167 33.667,123.167 33.667,108.114
+5V on L3(PWR) "+5V_L03_P060" (solid, pour order 60): 47.779,110.242 47.603,110.066 43.974,110.066 43.974,104.556 43.924,104.544 41.2,104.544 41.2,114.954 47.779,114.954
+5V on L3(PWR) "+5V_L03_P061" (solid, pour order 61): 38.502,30.154 36.296,30.154 36.296,23.834 38.502,23.834 38.502,14.034 34.448,14.034 34.448,92.789 38.502,92.789
+5V on L3(PWR) "+5V_L03_P062" (solid, pour order 62): 37.044,90.188 34.449,92.784 41.463,99.798 44.059,97.202
+5V on L3(PWR) "+5V_L03_P098" (solid, pour order 98): 40.26,97.23 40.26,105.3 43.978,105.3 43.978,97.23
+3V3 on L3(PWR) "+3V3_L03_P099" (solid, pour order 99): 52.64,104.822 129.147,104.822 129.147,54.056 134.558,54.056 134.558,108.033 134.154,108.437 52.548,108.437
+3V3 on L3(PWR) "+3V3_L03_P100" (solid, pour order 100): 73.047,107.353 73.047,81.618 69.705,78.276 69.705,66.673 70.303,66.075 70.303,60.621 70.926,60.621 70.926,77.201 74.938,81.213 74.938,107.331
+3V3 on L3(PWR) "+3V3_L03_P101" (solid, pour order 101): 70.048,60.495 76.418,60.495 76.418,61.607 70.048,61.607
+3V3 on L3(PWR) "+3V3_L03_P102" (solid, pour order 102): 67.821,51.676 67.821,52.716 76.581,52.716 76.581,51.676
+3V3 on L3(PWR) "+3V3_L03_P103" (solid, pour order 103): 67.157,52.15 67.157,58.755 68.269,58.755 68.269,52.15
+3V3 on L3(PWR) "+3V3_L03_P126" (solid, pour order 126): 75.886,52.057 76.983,52.057 76.983,61.226 75.886,61.226
GND on L3(PWR) "GND_PWR_L3" (solid, remove dead copper, shelved, pour order 128): 0,131.3 143.9,131.3 143.9,130.842 143.905,130.837 143.9,130.832 143.9,0.003 143.896,-0.001 143.89,0.004 137.838,0.004 137.832,0.01 137.819,-0.004 100.125,-0.004 100.121,0 100.114,-0.007 0.006,-0.007 0,-0.001
GND on L4(SIG) "GND_PWR_L4" (solid, remove dead copper, shelved, pour order 124): 0,131.3 0,0.008 0.006,0.001 0.007,0.002 4.638,0.002 4.639,0.001 4.644,0.007 17.536,0.007 17.551,-0.008 17.569,0.01 56.071,0.01 56.082,-0.002 143.899,-0.002 143.899,131.299 143.899,131.3
GND on L2(GND) "GND_PWR_L2" (solid, remove dead copper, pour order 15): 0.002,131.3 143.9,131.3 143.9,0 0,0

## Silkscreen, mask and mechanical layers (free items; w line width, h text height)
Top Overlay:
  circle w0.254: c54.691,78.782 r0.086
  region: 115.424,76.329 115.666,76.57 115.666,76.572 115.165,76.572 115.162,76.57
  region: 114.342,79.387 114.1,79.628 114.099,79.628 114.099,79.127 114.101,79.125
  lines w0.1: 113.874,79.367 114.604,79.367 ; 114.342,79.134 114.342,79.64 ; 115.172,76.329 115.677,76.329 ; 115.405,76.093 115.405,76.797 ; 77.406,125.083 77.406,130.523 78.7,130.523 78.7,125.083 77.406,125.083 ; 85.939,56.886 92.844,56.886 92.844,58.527 85.939,58.527 85.939,56.886 ; 92.721,125.908 92.721,130.612 94.015,130.612 94.015,125.908 92.721,125.908 ; 103.432,15.251 103.432,22.681 105.11,22.681 105.11,15.251 103.432,15.251 ; 113.09,120.323 113.09,130.443 114.698,130.443 114.698,120.323 113.09,120.323 ; 121.244,21.481 121.244,28.35 122.914,28.35 122.914,21.481 121.244,21.481 ; 131.695,121.323 131.695,130.425 133.348,130.425 133.348,121.323 131.695,121.323
  text "ESP32" at 93.837,126.278 h1.5 r90
  text "ESP32" at 132.984,125.918 h1.5 r90
  text "RX" at 124.564,125.675 h1 r90
  text "TX" at 130.089,125.659 h1 r90
  text "RX" at 105.963,125.638 h1 r90
  text "TX" at 111.06,125.638 h1 r90
  text "RP2350" at 78.523,125.485 h1.5 r90
  text "RP2350" at 114.351,124.94 h1.5 r90
  text "GND" at 108.491,124.755 h1 r90
  text "GND" at 127.068,124.631 h1 r90
  text "USB" at 93.849,123.117 h1.5 r90
  text "USB" at 78.535,122.324 h1.5 r90
  text "UART" at 132.986,121.669 h1.5 r90
  text "UART" at 114.362,120.647 h1.5 r90
  text "GND" at 73.655,109.634 h1
  text "+3V3" at 83.67,109.645 h1
  text "6" at 32.816,104.873 h1
  text "5" at 39.973,104.793 h1
  text "+5V" at 45.48,101.657 h1
  text "BOOT" at 80.658,101.585 h2
  text "RESET" at 90.342,101.589 h2
  text "BOOTSEL" at 64.297,101.331 h2
  text "RUN" at 53.654,101.116 h2
  text "2" at 32.86,99.723 h1
  text "1" at 40.055,99.703 h1
  text "LAT" at 17.689,99.482 h1 r90
  text "GND" at 20.079,99.449 h1 r90
  text "G2" at 7.631,99.438 h1 r90
  text "B" at 12.708,99.415 h1 r90
  text "E4" at 5.29,99.37 h1 r90
  text "E8" at 10.22,99.389 h1 r90
  text "D" at 15.03,99.381 h1 r90
  text "G1" at 2.748,99.328 h1 r90
  text "GND" at 45.502,99.325 h1
  text "+5V_PWR" at 41.507,97.125 h1
  text "+3V3" at 131.865,93.056 h1
  text "AN_IN" at 131.01,90.445 h1
  text "C" at 15.334,88.585 h1 r90
  text "A" at 12.648,88.527 h1 r90
  text "R1" at 2.478,87.932 h1 r90
  text "B1" at 5.03,87.894 h1 r90
  text "OE" at 20.247,87.721 h1 r90
  text "B2" at 10.211,87.587 h1 r90
  text "R2" at 7.621,87.568 h1 r90
  text "CLK" at 17.733,86.647 h1 r90
  text "NTC" at 137.437,85.92 h1.5
  text "G1" at 3.045,78.527 h1 r90
  text "E4" at 5.612,78.498 h1 r90
  text "LAT" at 18.008,78.342 h1 r90
  text "G2" at 7.95,78.297 h1 r90
  text "GND" at 20.398,78.308 h1 r90
  text "B" at 13.027,78.274 h1 r90
  text "E8" at 10.539,78.249 h1 r90
  text "D" at 15.349,78.241 h1 r90
  text "+3V3" at 132.257,77.779 h1
  text "SCL" at 133.04,75.286 h1
  text "SDA" at 132.933,72.58 h1
  text "GND" at 132.969,70.158 h1
  text "C" at 15.653,67.444 h1 r90
  text "A" at 12.967,67.386 h1 r90
  text "R1" at 2.797,66.792 h1 r90
  text "B1" at 5.349,66.753 h1 r90
  text "OE" at 20.565,66.581 h1 r90
  text "R2" at 7.94,66.427 h1 r90
  text "B2" at 10.53,66.446 h1 r90
  text "SENSOR" at 134.654,65.55 h2
  text "CLK" at 18.052,65.506 h1 r90
  text "LAT" at 18.145,57.337 h1 r90
  text "G2" at 8.087,57.293 h1 r90
  text "GND" at 20.534,57.304 h1 r90
  text "B" at 13.164,57.27 h1 r90
  text "E8" at 10.676,57.244 h1 r90
  text "D" at 15.486,57.237 h1 r90
  text "2350B" at 88.699,57.233 h1.5
  text "E4" at 5.746,57.225 h1 r90
  text "RP" at 86.267,57.224 h1.5
  text "G1" at 3.203,57.183 h1 r90
  text "C" at 15.79,46.44 h1 r90
  text "A" at 13.104,46.382 h1 r90
  text "R1" at 2.934,45.788 h1 r90
  text "B1" at 5.486,45.749 h1 r90
  text "R2" at 8.076,45.423 h1 r90
  text "B2" at 10.667,45.442 h1 r90
  text "OE" at 20.69,45.27 h1 r90
  text "CLK" at 18.188,44.502 h1 r90
  text "LAT" at 18.145,35.468 h1 r90
  text "G2" at 8.087,35.423 h1 r90
  text "GND" at 20.534,35.434 h1 r90
  text "B" at 13.164,35.4 h1 r90
  text "E8" at 10.676,35.375 h1 r90
  text "D" at 15.486,35.367 h1 r90
  text "E4" at 5.746,35.355 h1 r90
  text "G1" at 3.203,35.313 h1 r90
  text "DEBUG" at 67.547,33.792 h2
  text "SWDIO" at 72.767,29.04 h1 r270
  text "SWCLK" at 66.489,28.842 h1 r270
  text "GND" at 69.712,28.773 h1 r270
  text "ESP32" at 121.608,28.097 h1.5 r270
  text "2" at 35.192,28.093 h1
  text "6" at 45.108,27.922 h1
  text "5" at 45.108,25.187 h1
  text "1" at 35.432,25.153 h1
  text "C" at 15.79,24.57 h1 r90
  text "A" at 13.104,24.513 h1 r90
  text "R1" at 2.934,23.918 h1 r90
  text "B1" at 5.486,23.879 h1 r90
  text "R2" at 8.076,23.553 h1 r90
  text "B2" at 10.667,23.572 h1 r90
  text "OE" at 20.704,23.348 h1 r90
  text "S3" at 121.606,23.366 h1.5 r270
  text "CLK" at 18.188,22.632 h1 r90
  text "SD" at 104.748,20.58 h1.5 r90
  text "MICRO" at 104.748,15.605 h1.5 r90
Bottom Overlay:
  text "+5V" at 6.215,124.279 h1 r90
  text "GND" at 6.251,112.973 h1 r90
  text "16" at 22.757,98.16 h1 r90
  text "2" at 1.629,97.872 h1 r90
  text "15" at 22.793,92.303 h1 r90
  text "1" at 1.629,91.512 h1 r90
  text "16" at 23.146,76.68 h1 r90
  text "2" at 2.018,76.393 h1 r90
  text "15" at 23.182,70.823 h1 r90
  text "1" at 2.018,70.033 h1 r90
  text "16" at 22.959,55.532 h1 r90
  text "2" at 1.831,55.245 h1 r90
  text "15" at 22.995,49.675 h1 r90
  text "1" at 1.831,48.885 h1 r90
  text "16" at 23.243,33.915 h1 r90
  text "2" at 2.115,33.628 h1 r90
  text "15" at 23.279,28.058 h1 r90
  text "1" at 2.115,27.268 h1 r90
  text "+" at 2.864,19.905 h1 r90
  text "-" at 2.796,16.719 h1 r90
  text "+" at 2.966,10.841 h1 r90
  text "-" at 2.971,7.536 h1 r90
Top Paste:
  rectangle: 51.58,110.537 52.03,110.987
  rectangle: 51.58,111.807 52.03,112.257
  rectangle: 50.312,111.801 50.762,112.251
  rectangle: 50.322,110.536 50.772,110.986
  region: 72.596,58.237 73.66,58.237 73.661,58.239 73.67,58.23 73.67,57.165 72.603,57.165 72.6,57.162
  region: 72.598,54.958 73.672,54.958 73.665,54.965 73.665,56.026 72.607,56.026 72.601,56.019
  region: 70.384,54.94 70.389,54.935 71.456,54.935 71.456,56.013 71.454,56.015 71.451,56.013 70.384,56.013
  region: 70.382,58.228 71.446,58.228 71.448,58.23 71.456,58.221 71.456,57.156 70.389,57.156 70.387,57.153
Mechanical 13:
  circle w0.254: c54.695,78.785 r0.086
  lines w0.2: 143.4,22.3 143.9,22.3 ; 143.419,40.3 143.4,40.3 143.9,40.3 ; 143.9,40.3 143.9,131.3 112.7,131.3 84.8,131.3 30.5,131.3 0,131.3 0,85.4 0,60.2 0,26.9 0,5.2 0,0 95,0 102,0 143.9,0 143.9,5.2 143.9,40.3

## Text inside footprints (layer, text, board x,y; h text height)
C1: Top Overlay "+" at 30.061,110.967 h1.25 r180; Top Overlay "-" at 21.171,110.875 h1.25 r180
C2: Top Overlay "+" at 30.731,109.71 h1.25; Top Overlay "-" at 39.621,109.801 h1.25
C3: Top Overlay "+" at 30.763,119.616 h1.25; Top Overlay "-" at 39.653,119.707 h1.25
C4: Top Overlay "+" at 30.175,120.853 h1.25 r180; Top Overlay "-" at 21.285,120.762 h1.25 r180
U202: Top Overlay "*" at 97.735,64.428 h1.27; Mechanical 13 "*" at 99.796,62.527 h1.27